# Altium PCB NB3000XN.PcbDoc (part 31 of 71)
Units mil, origin at the board's own origin, x right, y up, seen from the top; angles counter-clockwise.
Board outline 9527.56 x 6929.77 mil, 6 copper layers (Top Layer, GND+SHIELD, MidLayer1, MidLayer2, P2 - 3V3+5V0, Bottom Layer), stack 62.375 mil thick; 832 components, 1027 nets, 4655 pads, 4981 vias.
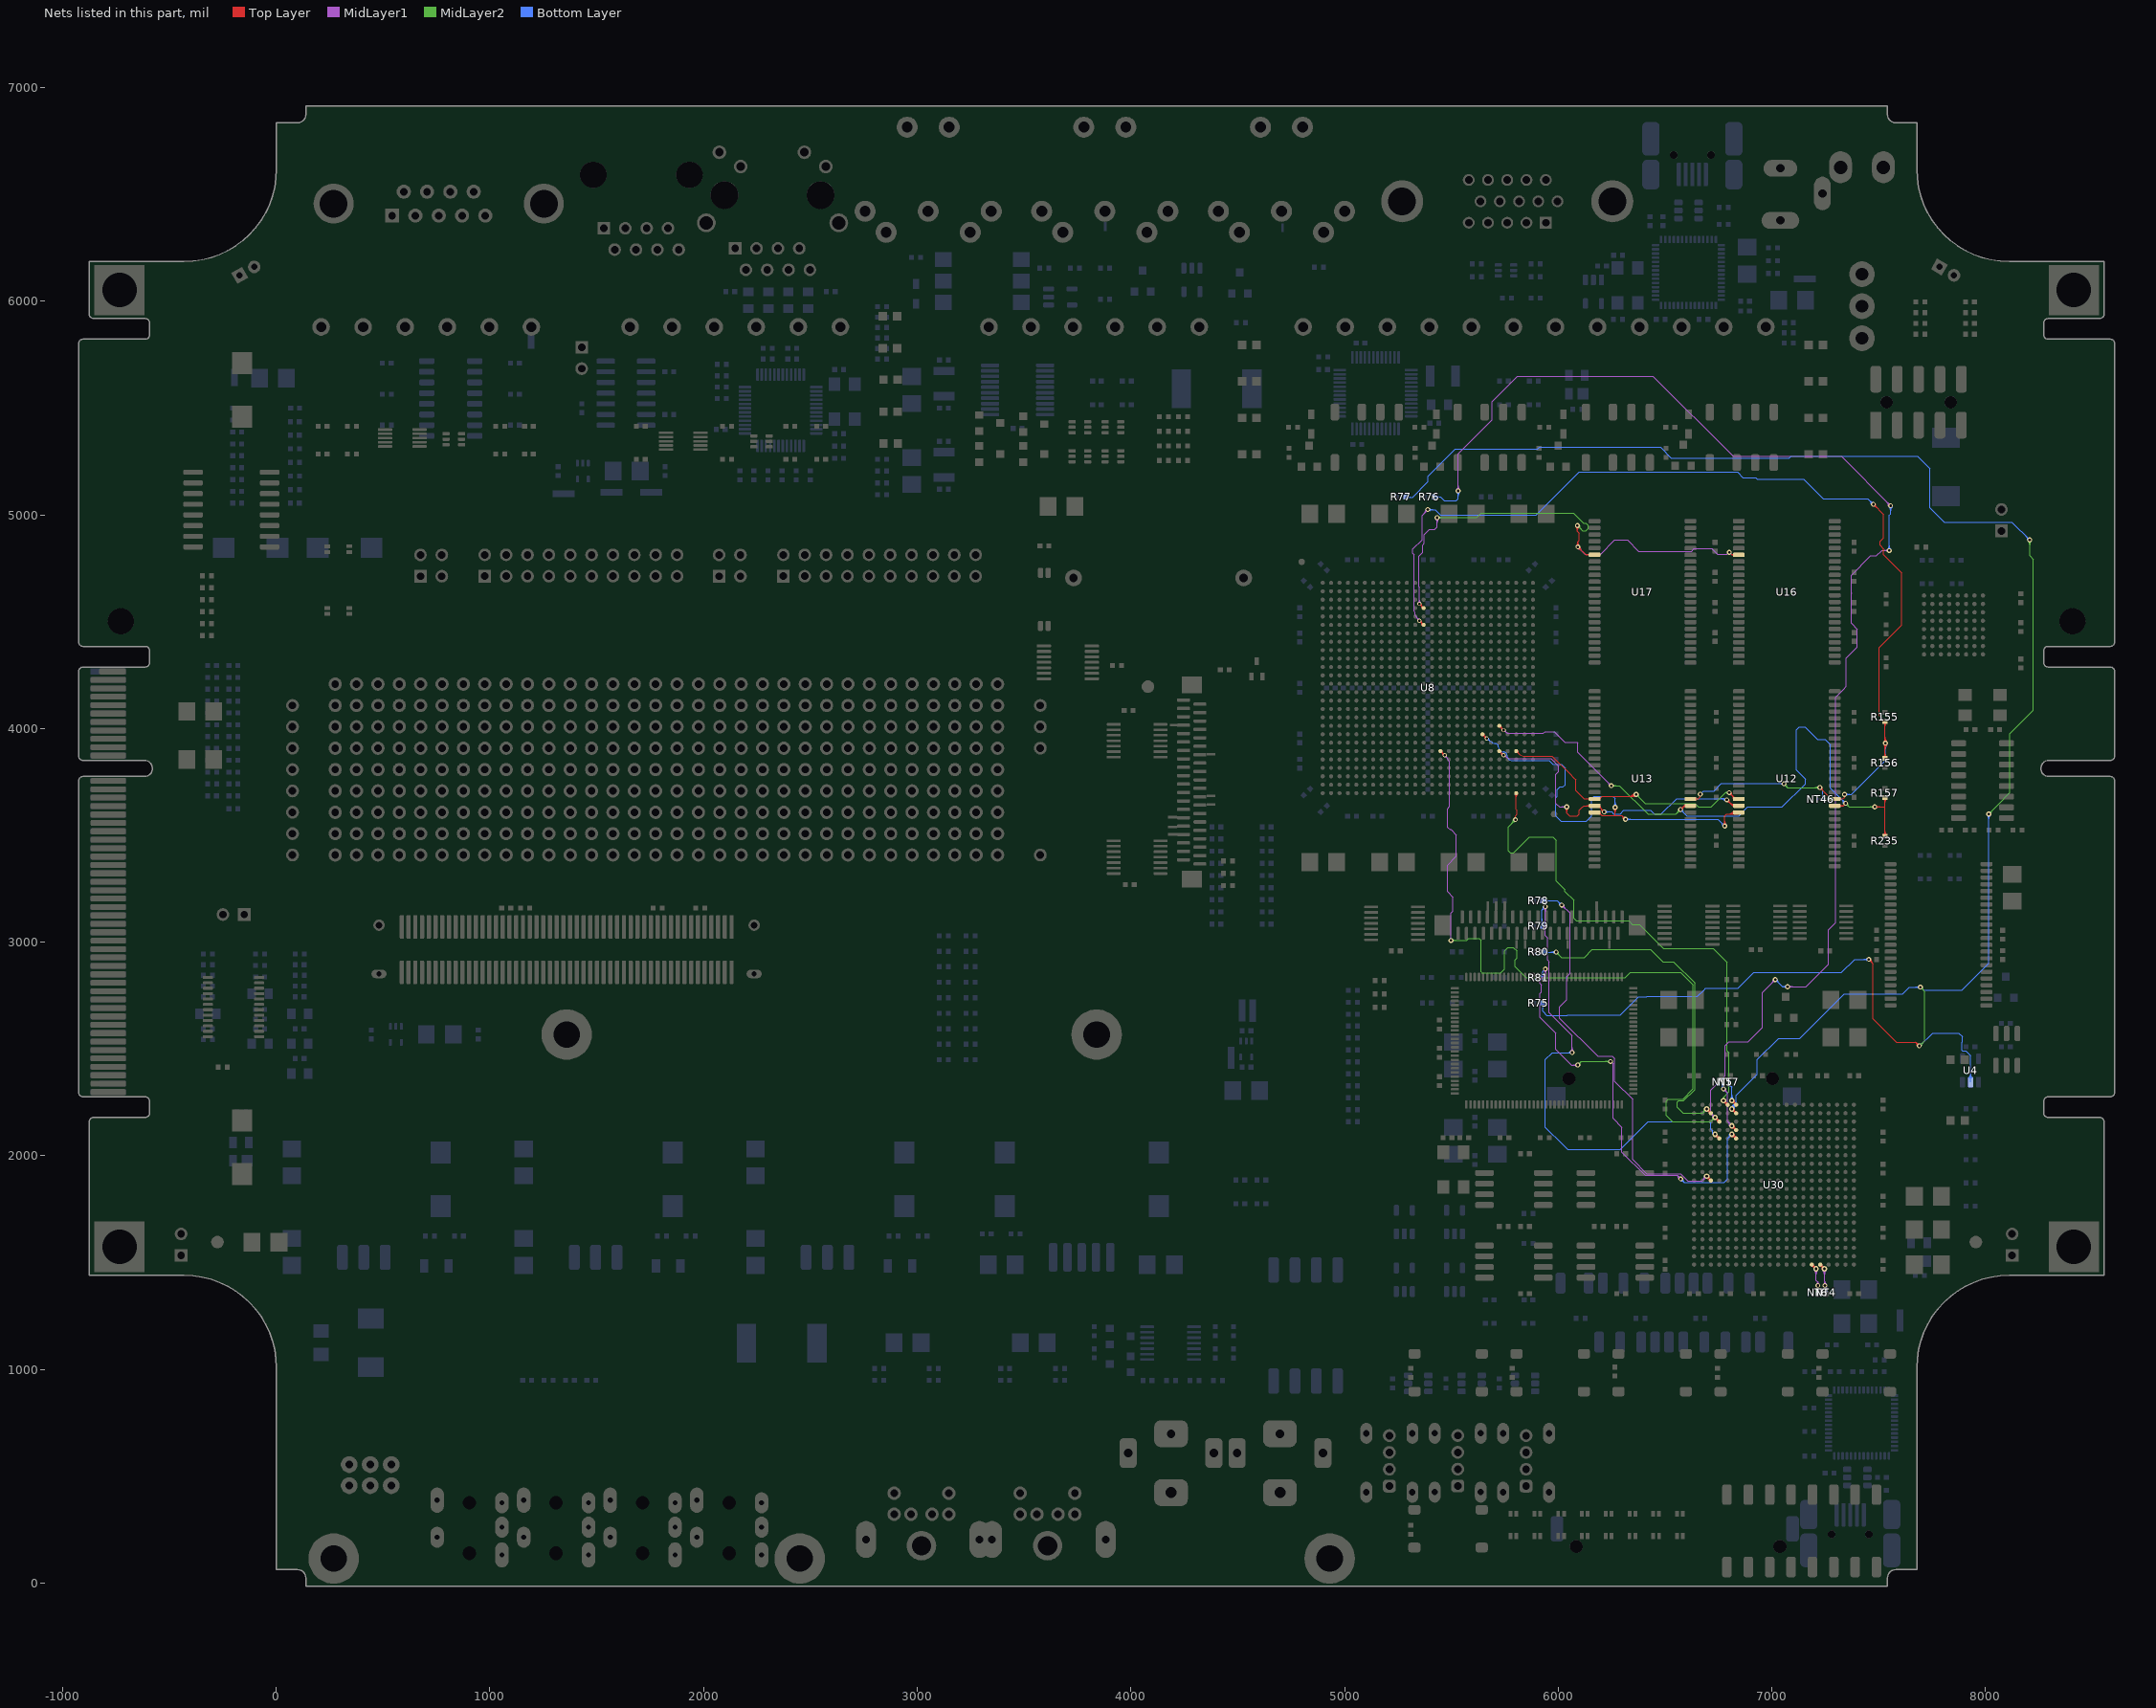
[diagram p35: the nets of this part, all layers, seen from the top]

## Via types
v1: diameter 23, hole 11.81, Top Layer to Bottom Layer, 3672 vias
v2: diameter 26, hole 11.81, Top Layer to Bottom Layer, 461 vias
v3: diameter 19, hole 11.81, Top Layer to Bottom Layer, tented both sides, 396 vias
v4: diameter 23.62, hole 11.81, Top Layer to Bottom Layer, 288 vias
v5: diameter 20, hole 11.81, Top Layer to Bottom Layer, 91 vias
v6: diameter 23, hole 11.81, Top Layer to Bottom Layer, tented both sides, 50 vias
v7: diameter 31, hole 11.81, Top Layer to Bottom Layer, 15 vias
v8: diameter 27.56, hole 11.81, Top Layer to Bottom Layer, tented both sides, 4 vias
v9: diameter 29, hole 11.81, Top Layer to Bottom Layer, 3 vias
v10: diameter 21, hole 11.81, Top Layer to Bottom Layer, 1 vias

## Nets (pads, with @x,y where several pads share a name; then routed paths per layer and width w, separated by ;. In a path a pad name is that pad's centre, name@x,y a point inside that pad or via, vN(x,y) a via of type N, cw(c..) or ccw(c..) an arc to the next point about the centre after c; other vN are vias at no path point) (continued)
DB_MEM.BUS_SDRAM_CKE: R157.2 R235.1 U8.V22 U12.37 U13.37 | length 3869.1
  Top Layer w4: U8.V22@5724.65,4005.33 cw(c5724.65,3987.23) 5737.45,4000.03 cw(c5750.25,4012.83) U8.V22@5732.15,4012.83 ; U8.V22@5724.65,4005.49 cw(c5724.65,3987.77) 5737.18,4000.3 cw(c5749.71,4012.83) U8.V22@5731.99,4012.83 ; U8.V22@5724.65,4012.83 v3(5744.33,3993.15) ; v1(6572.86,3621.04) 6590.83,3639.02 ; v1@6572.86,3626.54 ccw(c6572.86,3639.82) 6582.25,3630.43 ccw(c6591.64,3621.04) v1@6578.36,3621.04 ; v1@6572.86,3630.54 ccw(c6572.86,3653.48) 6589.07,3637.26 ccw(c6605.29,3621.04) v1@6582.36,3621.04 ; v1@6576.21,3624.4 cw(c6601.85,3598.76) U13.37@6601.85,3635.02 ; 6583.04,3631.22 cw(c6601.85,3612.41) U13.37@6601.85,3639.02 ; 6589.87,3638.05 cw(c6601.85,3626.07) U13.37@6601.85,3643.02 ; U13.37@6594.24,3636.54 ccw(c6590.83,3635.43) 6590.83,3639.02 ; U13.37@6594.24,3641.49 cw(c6590.83,3642.6) 6590.83,3639.02 ; U13.37@6619.41,3639.02 6590.83,3639.02 ; U12.37@7294.41,3639.02 7334.17,3639.02 v1(7345.19,3650.04) ; U12.37@7317.63,3633.36 cw(c7331.28,3619.7) 7331.28,3639.02 cw(c7331.28,3658.33) U12.37@7317.63,3644.67 ; v1(7481.86,3633.37) 7528.37,3633.37 7530,3635 ; v1@7485.75,3629.49 cw(c7495.14,3620.1) 7495.14,3633.37 cw(c7495.14,3646.65) v1@7485.75,3637.26 ; v1@7488.57,3626.66 cw(c7504.79,3610.44) 7504.79,3633.37 cw(c7504.79,3656.31) v1@7488.57,3640.09 ; R235.1@7523.41,3502.62 ccw(c7507.5,3518.52) 7530,3518.52 ccw(c7552.5,3518.52) R235.1@7536.59,3502.62 ; R157.2@7523.41,3671.01 cw(c7507.5,3655.1) 7530,3655.1 cw(c7552.5,3655.1) R157.2@7536.59,3671.01 ; R157.2@7524.23,3670.28 cw(c7514.83,3658.38) 7530,3658.38 ; R235.1@7526.24,3499.79 ccw(c7517.16,3508.87) 7530,3508.87 ccw(c7542.84,3508.87) R235.1@7533.76,3499.79 ; R157.2@7526.24,3673.84 cw(c7517.16,3664.76) 7530,3664.76 cw(c7542.84,3664.76) R157.2@7533.76,3673.84 ; R235.1@7530,3496.03 7530,3635 ; R157.2@7535.77,3670.28 ccw(c7545.17,3658.38) 7530,3658.38 ; 5731.53,4005.95 cw(c5718.72,3993.15) 5736.83,3993.15 ccw(c5718.72,3993.15) 5731.53,4005.95 ; 5731.53,4005.95 ccw(c5744.33,4018.76) 5744.33,4000.65 cw(c5744.33,4018.76) 5731.53,4005.95 ; 7530,3635 R157.2@7530,3677.6 7530,3658.37
  MidLayer1 w4: v3@5744.98,3985.68 cw(c5746.56,3967.64) 5758.2,3981.51 cw(c5769.84,3995.38) v3@5751.8,3993.8 ; 5757.91,3981.76 ccw(c5767.84,3991.69) 5767.84,3977.64 5861.38,3977.64 5910,3977.64 5920,3977.64 5931.48,3977.64 5938.99,3985.15 5982.91,3985.15 6031.69,3936.37 6088.52,3936.37 6091.19,3933.71 6091.19,3889.71 6114.19,3866.71 v1(6248.52,3732.37) ; v1@6239.02,3732.37 ccw(c6216.09,3732.37) 6232.31,3748.59 ccw(c6248.52,3764.81) v1@6248.52,3741.87 ; v1@6243.02,3732.37 ccw(c6229.75,3732.37) 6239.14,3741.76 ccw(c6248.52,3751.15) v1@6248.52,3737.87
  MidLayer2 w4: v1(6248.52,3732.37) 6287.63,3732.37 6419.96,3600.04 6551.86,3600.04 v1(6572.86,3621.04) ; v1@6252.41,3728.49 cw(c6261.8,3719.1) 6261.8,3732.37 cw(c6261.8,3745.65) v1@6252.41,3736.26 ; v1@6255.24,3725.66 cw(c6271.46,3709.44) 6271.46,3732.37 cw(c6271.46,3755.31) v1@6255.24,3739.09 ; v1@6563.36,3621.04 cw(c6540.42,3621.04) 6556.64,3604.82 cw(c6572.86,3588.61) v1@6572.86,3611.54 ; v1@6567.36,3621.04 cw(c6554.08,3621.04) 6563.47,3611.65 cw(c6572.86,3602.26) v1@6572.86,3615.54 ; v1@7345.19,3640.54 cw(c7345.19,3617.61) 7361.41,3633.82 cw(c7377.63,3650.04) v1@7354.69,3650.04 ; v1@7345.19,3644.54 cw(c7345.19,3631.26) 7354.58,3640.65 cw(c7363.97,3650.04) v1@7350.69,3650.04 ; v1(7345.19,3650.04) 7361.86,3633.37 v1(7481.86,3633.37) ; v1@7475.14,3626.66 ccw(c7458.92,3610.44) 7458.92,3633.37 ccw(c7458.92,3656.31) v1@7475.14,3640.09 ; v1@7477.97,3629.49 ccw(c7468.58,3620.1) 7468.58,3633.37 ccw(c7468.58,3646.65) v1@7477.97,3637.26
  Bottom Layer w4: v1@6572.86,3611.54 cw(c6572.86,3588.61) 6589.07,3604.82 cw(c6605.29,3621.04) v1@6582.36,3621.04 ; v1@6572.86,3615.54 cw(c6572.86,3602.26) 6582.25,3611.65 cw(c6591.64,3621.04) v1@6578.36,3621.04 ; v1(6572.86,3621.04) 6602.19,3591.71 6845.54,3591.71 6887.21,3633.37 7048.52,3633.37 7156.86,3741.71 7156.86,3763.37 7115.19,3805.04 7115.19,3994.37 7129.19,4008.37 7155.86,4008.37 7214.19,3950.04 7248.52,3950.04 7273.52,3925.04 7273.52,3721.71 v1(7345.19,3650.04) ; v1@7335.69,3650.04 ccw(c7312.76,3650.04) 7328.97,3666.26 ccw(c7345.19,3682.48) v1@7345.19,3659.54 ; v1@7339.69,3650.04 ccw(c7326.41,3650.04) 7335.8,3659.43 ccw(c7345.19,3668.82) v1@7345.19,3655.54
DB_MEM.BUS_SDRAM_CLK: NT46.2 R155.2 R156.1 U8.F13 U12.38 U13.38 | length 6403.5
  Top Layer w4: v3(5350.63,4504.96) U8.F13@5370.31,4485.28 ; U8.F13@5362.81,4485.28 ccw(c5344.71,4485.28) 5357.51,4498.08 ccw(c5370.31,4510.88) U8.F13@5370.31,4492.78 ; U8.F13@5362.97,4485.28 ccw(c5345.25,4485.28) 5357.78,4497.81 ccw(c5370.31,4510.34) U8.F13@5370.31,4492.62 ; U13.38@6619.41,3670.51 6655.99,3670.51 ; U13.38@6642.69,3664.92 cw(c6655.99,3651.89) 6655.99,3670.51 ; U13.38@6642.69,3676.11 ccw(c6655.99,3689.13) 6655.99,3670.51 ; v1(6665.19,3693.04) 6665.19,3679.71 6655.99,3670.51 ; v1@7224.86,3714.54 cw(c7224.86,3691.61) 7241.07,3707.82 cw(c7257.29,3724.04) v1@7234.36,3724.04 ; v1@7224.86,3718.54 cw(c7224.86,3705.26) 7234.25,3714.65 cw(c7243.64,3724.04) v1@7230.36,3724.04 ; v1(7224.86,3724.04) 7265.19,3683.71 7265.19,3670.51 ; U12.38@7269.39,3667.63 ccw(c7265.19,3666.01) 7265.19,3670.51 ; U12.38@7269.39,3673.39 cw(c7265.19,3675.01) 7265.19,3670.51 ; U12.38@7317.63,3664.85 cw(c7331.28,3651.2) 7331.28,3670.51 cw(c7331.28,3689.83) U12.38@7317.63,3676.17 ; v1(7340.19,3691.71) 7340.19,3678.51 7332.19,3670.51 U12.38@7294.41,3670.51 7265.19,3670.51 ; v1@7474.86,5040.54 cw(c7474.86,5017.61) 7491.07,5033.82 cw(c7507.29,5050.04) v1@7484.36,5050.04 ; v1@7474.86,5044.54 cw(c7474.86,5031.26) 7484.25,5040.65 cw(c7493.64,5050.04) v1@7480.36,5050.04 ; v1(7474.86,5050.04) 7523.52,5001.37 7523.52,4892.81 7507.19,4876.48 7507.19,4857.62 7523.52,4841.29 7523.52,4812.73 7606.86,4729.39 7606.86,4483.37 7502.19,4378.71 7502.19,4061.63 R155.2@7530,4033.82 v1@7530,3933.71 ; 7513.25,4050.57 cw(c7496.5,4033.82) R155.2@7520.19,4033.82 ; 7514.44,4049.38 ccw(c7529.51,4064.45) R155.2@7529.51,4043.14 ; R155.2@7520.08,4043.74 cw(c7510.16,4033.82) R155.2@7524.19,4033.82 ; R155.2@7521.27,4042.55 ccw(c7529.51,4050.79) R155.2@7529.51,4039.14 ; R156.1@7523.41,3867.26 ccw(c7507.5,3883.17) 7530,3883.17 ccw(c7552.5,3883.17) R156.1@7536.59,3867.26 ; R155.2@7523.41,4027.23 cw(c7507.5,4011.32) 7530,4011.32 cw(c7552.5,4011.32) R155.2@7536.59,4027.23 ; v1@7525.14,3925.32 cw(c7513.41,3913.59) 7530,3913.59 ; v1@7525.14,3938.76 ccw(c7513.41,3950.49) 7530,3950.49 ; R156.1@7526.24,3864.43 ccw(c7517.16,3873.51) 7530,3873.51 ccw(c7542.84,3873.51) R156.1@7533.76,3864.43 ; R155.2@7526.24,4030.06 cw(c7517.16,4020.98) 7530,4020.98 cw(c7542.84,4020.98) R155.2@7533.76,4030.06 ; R156.1@7530,3860.67 v1@7530,3932.04 ; 7530,3904.62 cw(c7559.28,3904.62) v1@7538.57,3925.32 ; 7530,3914.28 cw(c7549.62,3914.28) v1@7535.75,3928.15 ; 7530,3949.8 ccw(c7549.62,3949.8) v1@7535.75,3935.93 ; 7530,3959.46 ccw(c7559.28,3959.46) v1@7538.57,3938.76 ; 5363.43,4492.16 cw(c5376.24,4504.96) 5358.13,4504.96 ccw(c5376.24,4504.96) 5363.43,4492.16 ; 5363.43,4492.16 ccw(c5350.63,4479.35) 5350.63,4497.46 cw(c5350.63,4479.35) 5363.43,4492.16
  MidLayer1 w4: 5326.77,4581.77 5326.77,4567.84 ; v3@5343.16,4505.61 ccw(c5325.12,4507.19) 5338.99,4518.83 ; v3@5351.28,4512.43 cw(c5352.86,4530.47) 5338.99,4518.83 ; v1@5380.36,5025.04 cw(c5357.42,5025.04) 5373.64,5008.82 cw(c5389.86,4992.61) v1@5389.86,5015.54 ; v1@5384.36,5025.04 cw(c5371.08,5025.04) 5380.47,5015.65 cw(c5389.86,5006.26) v1@5389.86,5019.54 ; v1(5389.86,5025.04) 5362.86,4998.04 5362.86,4884.04 5321.19,4842.37 5319.17,4840.35 5319.17,4821 5326.77,4813.4 5326.77,4724.74 5326.77,4720 5326.77,4710 5326.77,4661.38 5326.77,4641.96 5326.77,4567.84 ; 5326.77,4567.84 5326.77,4548.34 ccw(c5368.5,4548.34) 5338.99,4518.83
  MidLayer2 w4: v1@7056.86,3732.21 cw(c7056.86,3711.69) 7071.37,3726.2 ; v1@7056.86,3736.21 cw(c7056.86,3725.34) 7064.54,3733.03 ; v1@7056.86,3740.71 7073.52,3724.04 v1(7224.86,3724.04) ; v1@7062.35,3741.53 ccw(c7076.5,3741.08) 7066.49,3731.07 ; v1@7066.35,3741.4 ccw(c7089.16,3740.67) 7073.02,3724.54 ; v1@7218.14,3717.32 ccw(c7201.92,3701.11) 7201.92,3724.04 ccw(c7201.92,3746.98) v1@7218.14,3730.76 ; v1@7220.97,3720.15 ccw(c7211.58,3710.76) 7211.58,3724.04 ccw(c7211.58,3737.32) v1@7220.97,3727.93
  Bottom Layer w4: v1(5389.86,5025.04) 5424.04,5025.04 5449.37,4999.71 5897.58,4999.71 6097.92,5200.04 6839.84,5200.04 6865.17,5174.71 6924.47,5174.71 6932.47,5166.71 7148.52,5166.71 7240.19,5075.04 7449.86,5075.04 v1(7474.86,5050.04) ; v1@5393.75,5021.15 cw(c5403.14,5011.76) 5403.14,5025.04 cw(c5403.14,5038.32) v1@5393.75,5028.93 ; v1@5396.57,5018.32 cw(c5412.79,5002.11) 5412.79,5025.04 cw(c5412.79,5047.98) v1@5396.57,5031.76 ; v1(6665.19,3693.04) 6680.19,3708.04 6729.15,3708.04 6763.82,3742.71 7055.86,3742.71 v1(7056.86,3741.71) ; 7031.51,3742.71 cw(c7031.51,3716.36) v1@7050.14,3734.99 ; 7036.34,3742.71 ccw(c7036.34,3762.23) v1@7050.14,3748.43 ; 7041.16,3742.71 cw(c7041.16,3726.02) v1@7052.97,3737.82 ; v1(7224.86,3724.04) 7239,3709.9 NT46.2@7239,3669 ; NT46.2@7236.17,3671.83 ccw(c7229.34,3678.66) 7239,3678.66 ccw(c7248.66,3678.66) NT46.2@7241.83,3671.83 ; v1(7340.19,3691.71) 7373.52,3691.71 7531.86,3850.04 v1(7531.86,3932.04) ; v1@7344.08,3687.82 cw(c7353.47,3678.43) 7353.47,3691.71 cw(c7353.47,3704.99) v1@7344.08,3695.6 ; v1@7346.91,3684.99 cw(c7363.13,3668.77) 7363.13,3691.71 cw(c7363.13,3714.64) v1@7346.91,3698.43 ; v1@7465.36,5050.04 ccw(c7442.42,5050.04) 7458.64,5066.26 ccw(c7474.86,5082.48) v1@7474.86,5059.54 ; v1@7469.36,5050.04 ccw(c7456.08,5050.04) 7465.47,5059.43 ccw(c7474.86,5068.82) v1@7474.86,5055.54 ; v1@7525.14,3925.32 cw(c7508.92,3909.11) 7531.86,3909.11 cw(c7554.79,3909.11) v1@7538.57,3925.32 ; v1@7527.97,3928.15 cw(c7518.58,3918.76) 7531.86,3918.76 cw(c7545.14,3918.76) v1@7535.75,3928.15
DB_MEM.BUS_SDRAM_NCAS: U8.AA24 U12.17 U13.17 | length 1676.9
  Top Layer w4: U13.17@6147.37,3664.85 ccw(c6133.72,3651.2) 6133.72,3670.51 ccw(c6133.72,3689.83) U13.17@6147.37,3676.17 ; U13.17@6188.81,3674.46 ccw(c6190.83,3686.56) 6199.51,3677.88 ; U13.17@6189.47,3678.4 ccw(c6192.41,3695.97) 6205,3683.37 ; U13.17@6196.15,3670.51 cw(c6205.84,3670.51) 6198.99,3677.36 ; 6322.14,3683.37 ccw(c6322.14,3734.76) v1@6358.47,3698.43 ; 6331.79,3683.37 ccw(c6331.79,3725.1) v1@6361.3,3695.6 ; 6341.45,3683.37 ccw(c6341.45,3715.45) v1@6364.13,3692.77 ; 6351.11,3683.37 ccw(c6351.11,3705.79) v1@6366.96,3689.94 ; v1(6365.19,3691.71) 6365.19,3685.04 6363.52,3683.37 6205,3683.37 ; v1@6800.52,3690.54 cw(c6800.52,3667.61) 6816.74,3683.82 cw(c6832.96,3700.04) v1@6810.02,3700.04 ; v1@6800.52,3694.54 cw(c6800.52,3681.26) 6809.91,3690.65 cw(c6819.3,3700.04) v1@6806.02,3700.04 ; v1(6800.52,3700.04) 6830.05,3670.51 U12.17@6845.59,3670.51 ; 6812.95,3687.62 cw(c6795.84,3670.51) U12.17@6820.03,3670.51 ; 6817.83,3682.74 ccw(c6828.03,3692.94) U12.17@6828.03,3678.51 ; 6819.77,3680.79 cw(c6809.49,3670.51) U12.17@6824.03,3670.51 ; 5815.92,3882.19 ccw(c5843.27,3909.54) 5843.27,3870.86 ; 5815.92,3882.19 ccw(c5843.27,3909.54) 5843.27,3870.86 ; 5815.92,3882.19 ccw(c5803.39,3869.66) 5803.39,3887.38 cw(c5803.39,3869.66) 5815.92,3882.19 ; 5815.92,3882.19 cw(c5828.45,3894.72) 5810.73,3894.72 ccw(c5828.45,3894.72) 5815.92,3882.19 ; 5843.27,3870.86 5910,3870.86 5920,3870.86 5971.06,3870.86 6052.7,3789.22 6074.88,3767.04 ; 6074.88,3767.04 6081.86,3760.06 ; 6074.88,3767.04 6081.86,3760.06 ; 6081.86,3760.06 6081.86,3710.04 6108.52,3683.37 6121.39,3670.51 U13.17@6170.59,3670.51 6192.14,3670.51 6205,3683.37
  MidLayer2 w4: v1@6365.19,3682.21 cw(c6365.19,3659.27) 6381.41,3675.49 cw(c6397.63,3691.71) v1@6374.69,3691.71 ; v1@6365.19,3686.21 cw(c6365.19,3672.93) 6374.58,3682.32 cw(c6383.97,3691.71) v1@6370.69,3691.71 ; v1(6365.19,3691.71) 6406.86,3650.04 6640.19,3650.04 6656.86,3633.37 6716.86,3633.37 6783.52,3700.04 ; v1@6792.43,3695.06 ccw(c6783.52,3689.58) 6783.52,3700.04 ; v1@6792.43,3705.02 cw(c6783.52,3710.5) 6783.52,3700.04 ; v1(6800.52,3700.04) 6783.52,3700.04
DB_MEM.BUS_SDRAM_NCS: U8.W20 U12.19 U13.19 | length 2619.8
  Top Layer w4: U8.W20@5645.91,3965.96 cw(c5645.91,3947.86) 5658.71,3960.66 cw(c5671.51,3973.46) U8.W20@5653.41,3973.46 ; U8.W20@5645.91,3966.12 cw(c5645.91,3948.4) 5658.44,3960.93 cw(c5670.97,3973.46) U8.W20@5653.25,3973.46 ; U8.W20@5645.91,3973.46 v3(5665.59,3953.78) ; U13.19@6170.59,3607.52 6189.86,3607.52 6205,3592.37 6265.19,3592.37 ; U13.19@6188.15,3599.52 cw(c6188.15,3576.09) 6204.72,3592.66 ; U13.19@6188.15,3603.52 cw(c6188.15,3589.75) 6197.89,3599.49 ; U13.19@6196.15,3607.52 ccw(c6211.35,3607.52) 6200.6,3596.77 ; v1@6259.81,3624.66 cw(c6243.59,3608.44) 6266.52,3608.44 cw(c6289.46,3608.44) v1@6273.24,3624.66 ; v1@6262.64,3627.49 cw(c6253.25,3618.1) 6266.52,3618.1 cw(c6279.8,3618.1) v1@6270.41,3627.49 ; v1@6265.19,3631.37 v1(6266.52,3631.37) 6266.52,3593.71 6265.19,3592.37 ; v1@6305.69,3575.04 ccw(c6282.76,3575.04) 6298.97,3591.26 ccw(c6315.19,3607.48) v1@6315.19,3584.54 ; v1@6309.69,3575.04 ccw(c6296.41,3575.04) 6305.8,3584.43 ccw(c6315.19,3593.82) v1@6315.19,3580.54 ; v1(6315.19,3575.04) 6297.86,3592.37 6265.19,3592.37 ; v1@6772.81,3550.76 ccw(c6756.59,3566.98) 6779.52,3566.98 ccw(c6802.46,3566.98) v1@6786.24,3550.76 ; v1@6775.64,3547.93 ccw(c6766.25,3557.32) 6779.52,3557.32 ccw(c6792.8,3557.32) v1@6783.41,3547.93 ; v1(6779.52,3544.04) 6779.52,3591.71 6787.86,3600.04 6838.11,3600.04 U12.19@6845.59,3607.52 ; 6790.66,3600.04 ccw(c6790.66,3644.89) U12.19@6822.37,3613.18 ; 6800.32,3600.04 ccw(c6800.32,3635.23) U12.19@6825.2,3610.35 ; 6809.98,3600.04 ccw(c6809.98,3625.58) U12.19@6828.03,3607.52 ; U12.19@6819.63,3600.04 ccw(c6819.63,3615.92) U12.19@6830.86,3604.69 ; 5652.79,3966.58 cw(c5639.98,3953.78) 5658.09,3953.78 ccw(c5639.98,3953.78) 5652.79,3966.58 ; 5652.79,3966.58 ccw(c5665.59,3979.39) 5665.59,3961.28 cw(c5665.59,3979.39) 5652.79,3966.58
  Bottom Layer w4: v3@5666.89,3946.39 cw(c5670.04,3928.56) 5680.42,3943.39 ; v3@5672.98,3955.08 ccw(c5690.81,3958.23) 5680.42,3943.39 ; 6266.52,3655 v1(6266.52,3631.37) 6266.52,3673.48 6256.29,3683.71 6168.5,3683.71 6156.86,3672.06 6156.86,3591.71 6131.86,3566.71 6014.19,3566.71 5989.19,3591.71 5989.19,3675 5996,3681.81 5996,3714 6009.19,3727.19 6022.38,3727.19 6032.81,3737.62 6032.81,3815.75 6015.19,3833.37 5975,3833.37 5957.11,3851.27 5920,3851.27 5910,3851.27 5841.96,3851.27 5783.7,3851.27 cw(c5783.7,3875.04) 5759.93,3875.04 ccw(c5744.33,3875.04) 5744.33,3890.64 cw(c5744.33,3914.41) 5720.56,3914.41 ccw(c5704.96,3914.41) 5704.96,3930.01 cw(c5704.96,3953.78) 5688.15,3936.97 5680.42,3943.39 ; v1(6315.19,3575.04) 6748.52,3575.04 v1(6779.52,3544.04) ; v1@6319.08,3571.15 cw(c6328.47,3561.76) 6328.47,3575.04 cw(c6328.47,3588.32) v1@6319.08,3578.93 ; v1@6321.91,3568.32 cw(c6338.13,3552.11) 6338.13,3575.04 cw(c6338.13,3597.98) v1@6321.91,3581.76 ; v1@6770.02,3544.04 ccw(c6747.09,3544.04) 6763.31,3560.26 ccw(c6779.52,3576.48) v1@6779.52,3553.54 ; v1@6774.02,3544.04 ccw(c6760.75,3544.04) 6770.14,3553.43 ccw(c6779.52,3562.82) v1@6779.52,3549.54 ; 6266.52,3644.65 cw(c6253.25,3644.65) 6262.64,3635.26 ccw(c6253.25,3644.65) 6266.52,3644.65 ; 6266.52,3644.65 ccw(c6279.8,3644.65) 6270.41,3635.26 cw(c6279.8,3644.65) 6266.52,3644.65 ; 6266.52,3654.31 cw(c6243.59,3654.31) 6259.81,3638.09 ccw(c6243.59,3654.31) 6266.52,3654.31 ; 6266.52,3654.31 ccw(c6289.46,3654.31) 6273.24,3638.09 cw(c6289.46,3654.31) 6266.52,3654.31
DB_MEM.BUS_SDRAM_NRAS: U8.AA22 U12.18 U13.18 | length 2151.1
  Top Layer w4: U8.AA22@5724.65,3887.22 cw(c5724.65,3869.12) 5737.45,3881.92 cw(c5750.25,3894.72) U8.AA22@5732.15,3894.72 ; U8.AA22@5724.65,3887.38 cw(c5724.65,3869.66) 5737.18,3882.19 cw(c5749.71,3894.72) U8.AA22@5731.99,3894.72 ; U8.AA22@5724.65,3894.72 v3(5744.33,3875.04) ; v1@6033.47,3626.66 cw(c6017.26,3610.44) 6040.19,3610.44 cw(c6063.13,3610.44) v1@6046.91,3626.66 ; v1@6036.3,3629.49 cw(c6026.91,3620.1) 6040.19,3620.1 cw(c6053.47,3620.1) v1@6044.08,3629.49 ; v1(6040.19,3633.37) 6040.19,3604.81 6053.29,3591.71 6090.19,3591.71 6098.52,3600.04 6098.52,3616.71 6112.76,3630.95 6120.83,3639.02 U13.18@6170.59,3639.02 6186.22,3639.02 6193.6,3631.63 v1(6215.19,3610.04) ; U13.18@6147.37,3633.36 ccw(c6133.72,3619.7) 6133.72,3639.02 ccw(c6133.72,3658.33) U13.18@6147.37,3644.67 ; U13.18@6188.15,3631.02 cw(c6188.15,3616.37) 6198.51,3626.73 ; U13.18@6192.15,3639.02 ccw(c6206.47,3639.02) 6196.34,3628.89 ; U13.18@6196.15,3639.02 ccw(c6220.13,3639.01) 6203.17,3622.06 ; v1@6205.69,3610.04 ccw(c6182.76,3610.04) 6198.97,3626.26 ccw(c6215.19,3642.48) v1@6215.19,3619.54 ; v1@6209.69,3610.04 ccw(c6196.41,3610.04) 6205.8,3619.43 ccw(c6215.19,3628.82) v1@6215.19,3615.54 ; v1@6789.19,3657.21 cw(c6789.19,3634.27) 6805.41,3650.49 cw(c6821.63,3666.71) v1@6798.69,3666.71 ; v1@6789.19,3661.21 cw(c6789.19,3647.93) 6798.58,3657.32 cw(c6807.97,3666.71) v1@6794.69,3666.71 ; v1(6789.19,3666.71) 6816.88,3639.02 ; v1@6795.34,3660.55 ccw(c6828.03,3693.24) U12.18@6828.03,3647.02 ; 6802.17,3653.73 ccw(c6828.03,3679.59) U12.18@6828.03,3643.02 ; 6809,3646.9 ccw(c6828.03,3665.93) U12.18@6828.03,3639.02 ; 6815.83,3640.07 ccw(c6828.03,3652.27) U12.18@6828.03,3635.02 ; U12.18@6820.45,3636.45 ccw(c6816.88,3635.25) 6816.88,3639.02 ; U12.18@6820.45,3641.58 cw(c6816.88,3642.78) 6816.88,3639.02 ; U12.18@6845.59,3639.02 6816.88,3639.02 ; 5731.53,3887.84 cw(c5718.72,3875.04) 5736.83,3875.04 ccw(c5718.72,3875.04) 5731.53,3887.84 ; 5731.53,3887.84 ccw(c5744.33,3900.65) 5744.33,3882.54 cw(c5744.33,3900.65) 5731.53,3887.84
  MidLayer1 w4: v3@5745.63,3867.65 cw(c5748.78,3849.82) 5759.16,3864.65 cw(c5769.55,3879.49) v3@5751.72,3876.34 ; 5759.19,3864.62 ccw(c5776.84,3892.66) 5777.01,3859.53 5861.38,3859.53 5910,3859.53 5920,3859.53 5966.53,3859.53 6003,3823.06 6003,3798.81 5989.19,3785 5989.19,3650.04 6005.86,3633.37 v1(6040.19,3633.37) ; v1@6033.47,3626.66 ccw(c6017.26,3610.44) 6017.26,3633.37 ccw(c6017.26,3656.31) v1@6033.47,3640.09 ; v1@6036.3,3629.49 ccw(c6026.91,3620.1) 6026.91,3633.37 ccw(c6026.91,3646.65) v1@6036.3,3637.26
  Bottom Layer w4: v1(6215.19,3610.04) 6250.21,3610.04 6260.21,3600.04 6290.19,3600.04 6307.19,3617.04 6432.96,3617.04 6449.96,3600.04 ; v1@6219.08,3606.15 cw(c6228.47,3596.76) 6228.47,3610.04 cw(c6228.47,3623.32) v1@6219.08,3613.93 ; v1@6221.91,3603.32 cw(c6238.13,3587.11) 6238.13,3610.04 cw(c6238.13,3632.98) v1@6221.91,3616.76 ; 6450,3600 6449.96,3600.04 ; 6752.57,3672.37 cw(c6752.57,3630.09) v1@6782.47,3659.99 ; 6762.23,3672.37 cw(c6762.23,3639.75) v1@6785.3,3662.82 ; 6771.89,3672.37 cw(c6771.89,3649.41) v1@6788.13,3665.65 ; v1(6789.19,3666.71) 6783.52,3672.37 6554.19,3672.37 6481.86,3600.04 6449.96,3600.04
DB_MEM.BUS_SRAM_NCS: U8.D13 U16.6 U17.6 | length 2993.7
  Top Layer w4: v3(5350.63,4583.7) U8.D13@5370.31,4564.02 ; U8.D13@5362.81,4564.02 ccw(c5344.71,4564.02) 5357.51,4576.82 ccw(c5370.31,4589.62) U8.D13@5370.31,4571.52 ; U8.D13@5362.97,4564.02 ccw(c5345.25,4564.02) 5357.78,4576.55 ccw(c5370.31,4589.08) U8.D13@5370.31,4571.36 ; v1@6083.47,4943.32 cw(c6067.26,4927.11) 6090.19,4927.11 cw(c6113.13,4927.11) v1@6096.91,4943.32 ; v1@6085.47,4856.76 ccw(c6069.26,4872.98) 6092.19,4872.98 ccw(c6115.13,4872.98) v1@6098.91,4856.76 ; v1@6086.3,4946.15 cw(c6076.91,4936.76) 6090.19,4936.76 cw(c6103.47,4936.76) v1@6094.08,4946.15 ; v1@6088.3,4853.93 ccw(c6078.91,4863.32) 6092.19,4863.32 ccw(c6105.47,4863.32) v1@6096.08,4853.93 ; v1(6090.19,4950.04) 6090.19,4923.33 6098.52,4915 6098.52,4880 6092.19,4873.67 v1(6092.19,4850.04) 6129,4813.23 U17.6@6170.59,4813.23 ; v1@6092.19,4840.54 cw(c6092.19,4817.61) 6108.41,4833.82 cw(c6124.63,4850.04) v1@6101.69,4850.04 ; v1@6092.19,4844.54 cw(c6092.19,4831.26) 6101.58,4840.65 cw(c6110.97,4850.04) v1@6097.69,4850.04 ; U17.6@6147.37,4807.57 ccw(c6133.72,4793.91) 6133.72,4813.23 ccw(c6133.72,4832.54) U17.6@6147.37,4818.88 ; v1(6800.86,4825.04) 6812.67,4813.23 ; U16.6@6821.48,4808.64 ccw(c6812.67,4802.48) 6812.67,4813.23 ; U16.6@6821.48,4817.81 cw(c6812.67,4823.97) 6812.67,4813.23 ; U16.6@6845.59,4813.23 6812.67,4813.23 ; 5363.43,4570.9 cw(c5376.24,4583.7) 5358.13,4583.7 ccw(c5376.24,4583.7) 5363.43,4570.9 ; 5363.43,4570.9 ccw(c5350.63,4558.09) 5350.63,4576.2 cw(c5350.63,4558.09) 5363.43,4570.9
  MidLayer1 w4: v3@5345.44,4588.89 ccw(c5332.9,4601.43) 5350.63,4601.43 ccw(c5368.36,4601.43) v3@5355.82,4588.89 ; v3(5350.63,4583.7) 5350.63,4661.38 5347.5,4664.51 5347.5,4710 5347.5,4720 5347.5,4807.35 5365.19,4825.04 5365.19,4858.37 5373.52,4866.71 5373.52,4908.37 5397.69,4932.54 5422.11,4932.54 5432.69,4943.12 5432.69,4950.87 5433.19,4951.37 5433.52,4951.71 v1(5433.52,4987.37) ; v1@5426.81,4980.66 cw(c5410.59,4964.44) 5433.52,4964.44 cw(c5456.46,4964.44) v1@5440.24,4980.66 ; v1@5429.64,4983.49 cw(c5420.25,4974.1) 5433.52,4974.1 cw(c5446.8,4974.1) v1@5437.41,4983.49 ; v1@6092.19,4840.54 cw(c6092.19,4817.61) 6108.41,4833.82 cw(c6124.63,4850.04) v1@6101.69,4850.04 ; v1@6092.19,4844.54 cw(c6092.19,4831.26) 6101.58,4840.65 cw(c6110.97,4850.04) v1@6097.69,4850.04 ; v1(6092.19,4850.04) 6125.52,4816.71 6198.52,4816.71 6265.19,4883.37 6323.52,4883.37 6376.52,4830.37 6510,4830.37 6623.67,4830.37 6635,4841.71 6719.19,4841.71 6745.52,4815.37 6791.19,4815.37 v1(6800.86,4825.04) ; 5350.63,4601.81 cw(c5332.52,4601.81) 5345.33,4589 ccw(c5332.52,4601.81) 5350.63,4601.81 ; 5350.63,4601.81 ccw(c5368.74,4601.81) 5355.93,4589 cw(c5368.74,4601.81) 5350.63,4601.81
  MidLayer2 w4: v1(5433.52,4987.37) 5618.58,4987.37 5639.41,5008.2 6071.84,5008.2 6119.5,4960.54 6130.77,4960.54 6141.02,4950.29 6141.02,4935.79 6130.77,4925.54 6114.69,4925.54 v1@6088,4952.23 ; v1@5437.41,4983.49 cw(c5446.8,4974.1) 5446.8,4987.37 cw(c5446.8,5000.65) v1@5437.41,4991.26 ; v1@5440.24,4980.66 cw(c5456.46,4964.44) 5456.46,4987.37 cw(c5456.46,5010.31) v1@5440.24,4994.09 ; v1@6090.19,4940.54 cw(c6090.19,4917.61) 6106.41,4933.82 cw(c6122.62,4950.04) v1@6099.69,4950.04 ; v1@6090.19,4944.54 cw(c6090.19,4931.26) 6099.58,4940.65 cw(c6108.97,4950.04) v1@6095.69,4950.04
DB_PROGRAM.CCLK: R78.1 U30.V10 | length 2223.1
  Top Layer w8: v2@6695.04,1895.37 cw(c6695.04,1873.64) 6710.4,1889.01 cw(c6725.77,1904.37) v2@6704.04,1904.37 ; v2(6695.04,1904.37) U30.V10@6714.72,1884.68 ; U30.V10@6708.88,1884.68 ccw(c6694.78,1884.68) 6704.75,1894.66 ccw(c6714.72,1904.63) U30.V10@6714.72,1890.53
  MidLayer1 w4: v1@6016.52,3164.21 cw(c6016.52,3141.27) 6032.74,3157.49 cw(c6048.96,3173.71) v1@6026.02,3173.71 ; v1@6016.52,3168.21 cw(c6016.52,3154.93) 6025.91,3164.32 cw(c6035.3,3173.71) v1@6022.02,3173.71 ; v1(6016.52,3173.71) 6054.86,3135.37 6054.86,2853.35 6040.19,2838.69 6040.19,2730.39 6006.86,2697.06 6006.86,2644.69 6184.84,2466.71 6253.19,2466.71 6265.19,2454.71 6265.19,2348.04 6348.52,2264.71 6348.52,1983.37 6415.19,1916.71 6573.52,1916.71 6606.86,1883.37 6674.05,1883.37 v2(6695.04,1904.37) ; v2@6684.04,1904.37 cw(c6657.48,1904.37) 6676.26,1885.59 cw(c6695.04,1866.82) v2@6695.04,1893.37 ; v2@6688.04,1904.37 cw(c6671.14,1904.37) 6683.09,1892.42 cw(c6695.04,1880.47) v2@6695.04,1897.37
  Bottom Layer w4: R78.1@5928.18,3195 5995.23,3195 v1(6016.52,3173.71) ; R78.1@5931.94,3191.24 cw(c5941.02,3182.16) 5941.02,3195 cw(c5941.02,3207.84) R78.1@5931.94,3198.76 ; R78.1@5934.77,3188.41 cw(c5950.68,3172.5) 5950.68,3195 cw(c5950.68,3217.5) R78.1@5934.77,3201.59 ; v1@6007.02,3173.71 ccw(c5984.09,3173.71) 6000.31,3189.93 ccw(c6016.52,3206.14) v1@6016.52,3183.21 ; v1@6011.02,3173.71 ccw(c5997.75,3173.71) 6007.14,3183.1 ccw(c6016.52,3192.49) v1@6016.52,3179.21
DB_PROGRAM.DIN: U8.AF24 U30.T1 | length 2629.5
  Top Layer w4: U8.AF24@5798.08,3692.57 cw(c5785.28,3679.77) 5803.39,3679.77 cw(c5821.49,3679.77) U8.AF24@5808.69,3692.57 ; U8.AF24@5798.19,3692.68 cw(c5785.66,3680.15) 5803.39,3680.15 cw(c5821.11,3680.15) U8.AF24@5808.58,3692.68 ; v1(5799.86,3573.37) 5799.86,3591.17 5807.69,3599 5807.69,3618.96 5803.39,3623.26 5803.39,3660 5803.39,3670 U8.AF24@5803.39,3697.87
  Top Layer w8: v2@6773.78,2249.7 cw(c6773.78,2227.97) 6789.14,2243.34 cw(c6804.51,2258.7) v2@6782.78,2258.7 ; v2(6773.78,2258.7) U30.T1@6793.46,2239.02 ; U30.T1@6787.62,2239.02 ccw(c6773.52,2239.02) 6783.49,2248.99 ccw(c6793.46,2258.96) U30.T1@6793.46,2244.86
  MidLayer2 w4: v1@5790.36,3573.37 cw(c5767.42,3573.37) 5783.64,3557.16 cw(c5799.86,3540.94) v1@5799.86,3563.87 ; v1@5794.36,3573.37 cw(c5781.08,3573.37) 5790.47,3563.99 cw(c5799.86,3554.6) v1@5799.86,3567.87 ; v1(5799.86,3573.37) 5766.86,3540.37 5766.86,3428.14 5776.63,3418.37 5791.86,3418.37 5865.19,3491.71 5975.19,3491.71 5990.86,3476.04 5990.86,3286.04 6031.86,3245.04 6031.86,3238.14 6073.52,3196.48 6073.52,3111.35 6085.17,3099.71 6331.48,3099.71 6347.82,3083.37 6380.09,3083.37 6492.43,2971.04 6726.52,2971.04 6790.86,2906.71 6790.86,2491.04 6798.52,2483.37 6798.52,2300.04 6773.78,2275.3 ; v2@6769.5,2268.83 ccw(c6766.76,2275.3) 6773.78,2275.3 ; v2(6773.78,2258.7) 6773.78,2275.3 ; v2@6778.06,2268.83 cw(c6780.8,2275.3) 6773.78,2275.3
DB_PROGRAM.DONE: R75.1 R77.1 U4.2 U30.R2 | length 10924.7
  Top Layer w4: v1@7453.86,2910.21 cw(c7453.86,2887.27) 7470.07,2903.49 cw(c7486.29,2919.71) v1@7463.36,2919.71 ; v1@7453.86,2914.21 cw(c7453.86,2900.93) 7463.25,2910.32 cw(c7472.64,2919.71) v1@7459.36,2919.71 ; v1(7453.86,2919.71) 7473.52,2900.04 7473.52,2641.71 7550.09,2565.14 7583.67,2531.57 7673.43,2531.57 v1(7690,2515) ; v1@7680.5,2515 ccw(c7657.56,2515) 7673.78,2531.22 ccw(c7690,2547.43) v1@7690,2524.5 ; v1@7684.5,2515 ccw(c7671.22,2515) 7680.61,2524.39 ccw(c7690,2533.78) v1@7690,2520.5
  Top Layer w8: v2@6813.15,2210.33 cw(c6813.15,2188.6) 6828.51,2203.97 cw(c6843.88,2219.33) v2@6822.15,2219.33 ; v2(6813.15,2219.33) U30.R2@6832.83,2199.65 ; U30.R2@6826.99,2199.65 ccw(c6812.89,2199.65) 6822.86,2209.62 ccw(c6832.83,2219.59) U30.R2@6832.83,2205.49
  MidLayer2 w4: v1@7690,2520.5 ccw(c7690,2540.58) 7704.2,2526.38 ; v1@7690,2524.5 ccw(c7690,2554.23) 7711.03,2533.21 ; v1@7692.82,2515 7715.52,2537.71 7715.52,2769.48 v1(7695,2790) ; v1@7695,2780.5 cw(c7695,2757.56) 7711.22,2773.78 cw(c7727.44,2790) v1@7704.5,2790 ; v1@7695,2784.5 cw(c7695,2771.22) 7704.39,2780.61 cw(c7713.78,2790) v1@7700.5,2790 ; v1@7699.5,2515 cw(c7715.64,2515) 7704.23,2526.41 ; v1(8015.19,3600.04) 8060.07,3644.93 ; v1@8015.19,3605.54 ccw(c8015.19,3618.82) 8024.58,3609.43 ccw(c8033.97,3600.04) v1@8020.69,3600.04 ; v1@8015.19,3609.54 ccw(c8015.19,3632.48) 8031.41,3616.26 ccw(c8047.63,3600.04) v1@8024.69,3600.04 ; 8060,3645 8114.86,3699.86 8114.86,3977.06 8223.52,4085.73 8223.52,4791.71 8206.86,4808.37 v1(8206.86,4883.37) ; v1@8200.14,4876.66 cw(c8183.92,4860.44) 8206.86,4860.44 cw(c8229.79,4860.44) v1@8213.57,4876.66 ; v1@8202.97,4879.49 cw(c8193.58,4870.1) 8206.86,4870.1 cw(c8220.14,4870.1) v1@8210.75,4879.49
  Bottom Layer w4: R77.1@5286.18,5085 5286.18,5083.37 5318.52,5083.37 5391.52,5156.37 5391.52,5181.52 5517.5,5307.5 5903.31,5307.5 5913.19,5317.37 6478,5317.37 6528.67,5266.71 7081.67,5266.71 7090,5275.04 7682.33,5275.04 7740.19,5217.18 7740.19,5033.37 7806.86,4966.71 8123.52,4966.71 v1(8206.86,4883.37) ; R77.1@5289.94,5088.27 ccw(c5301.76,5100.08) 5301.76,5083.37 ; R77.1@5292.77,5077.92 cw(c5305.94,5064.75) 5305.94,5083.37 ; R77.1@5292.77,5091.1 ccw(c5311.41,5109.74) 5311.41,5083.37 ; R75.1@5921.59,2707.92 cw(c5905.68,2692.01) 5928.18,2692.01 cw(c5950.68,2692.01) R75.1@5934.77,2707.92 ; R75.1@5924.42,2710.75 cw(c5915.34,2701.67) 5928.18,2701.67 cw(c5941.02,2701.67) R75.1@5931.94,2710.75 ; R75.1@5928.18,2715 5928.18,2676.82 5946.96,2658.04 6041.96,2658.04 ; 6041.96,2658.37 6290.19,2658.37 6375.86,2744.04 6413.86,2744.04 6416.86,2747.04 6652.52,2747.04 6681.86,2776.37 6689.19,2783.71 6841.13,2783.71 6915.8,2858.37 7325.9,2858.37 7387.23,2919.71 v1(7453.86,2919.71) ; v2@6812.17,2219.13 cw(c6829.59,2222.64) 6817.03,2235.21 ; v2@6815.19,2219.33 6815.19,2233.37 6832.86,2251.04 ; v2@6816.09,2219.92 cw(c6838.38,2224.41) 6822.3,2240.49 ; v2@6820.01,2220.71 cw(c6847.16,2226.18) 6827.58,2245.76 ; v2@6823.93,2221.5 cw(c6855.95,2227.95) 6832.86,2251.04 ; v1@7447.14,2912.99 ccw(c7430.92,2896.77) 7430.92,2919.71 ccw(c7430.92,2942.64) v1@7447.14,2926.43 ; v1@7449.97,2915.82 ccw(c7440.58,2906.43) 7440.58,2919.71 ccw(c7440.58,2932.99) v1@7449.97,2923.6 ; v1@7688.28,2783.28 ccw(c7672.06,2767.06) 7672.06,2790 ccw(c7672.06,2812.93) v1@7688.28,2796.72 ; v1@7690,2520.5 ccw(c7690,2540.58) 7704.2,2526.38 ; v1@7690,2524.5 ccw(c7690,2554.23) 7711.03,2533.21 ; v1@7691.11,2786.11 ccw(c7681.72,2776.72) 7681.72,2790 ccw(c7681.72,2803.28) v1@7691.11,2793.89 ; v1@7692.82,2515 7752.86,2575.04 7874.52,2575.04 7891.52,2558.04 7891.52,2533.37 7890.19,2532.04 7890.19,2494.37 7892.86,2491.71 7906.86,2491.71 7930,2468.56 U4.2@7930,2344.88 ; v1@7699.5,2515 cw(c7715.64,2515) 7704.23,2526.41 ; U4.2@7923.06,2365.6 ccw(c7906.31,2382.35) 7930,2382.35 ccw(c7953.68,2382.35) U4.2@7936.94,2365.6 ; U4.2@7925.89,2362.77 ccw(c7915.97,2372.69) 7930,2372.69 ccw(c7944.03,2372.69) U4.2@7934.11,2362.77 ; v1@8008.47,3593.32 cw(c7992.26,3577.11) 8015.19,3577.11 cw(c8038.13,3577.11) v1@8021.91,3593.32 ; v1@8011.3,3596.15 cw(c8001.91,3586.76) 8015.19,3586.76 cw(c8028.47,3586.76) v1@8019.08,3596.15 ; v1(8015.19,3600.04) 8015.19,2900.65 7889.58,2775.04 7709.96,2775.04 v1(7695,2790) 7643.84,2790 7611.88,2758.04 7339.86,2758.04 7131.86,2550.04 7031.86,2550.04 6931.86,2450.04 6931.86,2382.37 6832.86,2283.37 6832.86,2251.04 ; v1@8197.36,4883.37 ccw(c8174.42,4883.37) 8190.64,4899.59 ccw(c8206.86,4915.81) v1@8206.86,4892.87 ; v1@8201.36,4883.37 ccw(c8188.08,4883.37) 8197.47,4892.76 ccw(c8206.86,4902.15) v1@8206.86,4888.87
DB_PROGRAM.ID0: NT4.1 U30.E20 | length 340.4
  Top Layer w8: U30.E20@7226.54,1485.14 cw(c7226.54,1471.04) 7236.51,1481.01 cw(c7246.48,1490.98) U30.E20@7232.38,1490.98 ; U30.E20@7226.54,1490.98 v2(7246.22,1471.3) ; v2@7237.22,1471.3 ccw(c7215.49,1471.3) 7230.86,1486.66 ccw(c7246.22,1502.03) v2@7246.22,1480.3
  MidLayer1 w4: v2@7238.44,1463.52 cw(c7219.66,1444.74) 7246.22,1444.74 cw(c7272.78,1444.74) v2@7254,1463.52 ; v2@7241.27,1466.35 cw(c7229.32,1454.4) 7246.22,1454.4 ; v1@7243.98,1401.38 ccw(c7239.8,1409.04) 7248.52,1409.04 ; 7246.22,1454.4 cw(c7263.12,1454.4) v2@7251.17,1466.35 ; v2(7246.22,1471.3) 7246.22,1411.34 7248.52,1409.04 ; v1(7248.52,1393.04) 7248.52,1409.04 ; v1@7253.07,1401.38 cw(c7257.25,1409.04) 7248.52,1409.04
  Bottom Layer w4: v1@7244.88,1384.27 cw(c7238.59,1369.11) NT4.1@7255,1369.11 ; v1@7246.41,1387.96 cw(c7241.07,1375.1) NT4.1@7255,1375.1 ; v1@7247.95,1391.66 cw(c7243.56,1381.09) 7255,1381.09 ; v1(7248.52,1393.04) 7255,1386.56 NT4.1@7255,1370 ; NT4.1@7252.17,1377.33 ccw(c7245.34,1384.16) 7255,1384.16 ccw(c7264.66,1384.16) NT4.1@7257.83,1377.33
DB_PROGRAM.ID1: NT5.1 U30.R4 | length 467.6
  Top Layer w8: v2@6813.15,2131.59 cw(c6813.15,2109.86) 6828.51,2125.23 cw(c6843.88,2140.59) v2@6822.15,2140.59 ; v2(6813.15,2140.59) U30.R4@6832.83,2120.91 ; U30.R4@6826.99,2120.91 ccw(c6812.89,2120.91) 6822.86,2130.88 ccw(c6832.83,2140.85) U30.R4@6832.83,2126.75
  MidLayer1 w4: v1@6773.52,2303.87 cw(c6773.52,2280.94) 6789.74,2297.16 cw(c6805.96,2313.37) v1@6783.02,2313.37 ; v1@6773.52,2307.87 cw(c6773.52,2294.6) 6782.91,2303.99 cw(c6792.3,2313.37) v1@6779.02,2313.37 ; v1(6773.52,2313.37) 6792.86,2294.04 6792.86,2160.88 v2(6813.15,2140.59) ; v2@6802.15,2140.59 ccw(c6775.59,2140.59) 6794.37,2159.37 ccw(c6813.15,2178.14) v2@6813.15,2151.59 ; v2@6806.15,2140.59 ccw(c6789.25,2140.59) 6801.2,2152.54 ccw(c6813.15,2164.49) v2@6813.15,2147.59
  Bottom Layer w4: v1@6766.81,2320.09 ccw(c6759.1,2327.8) NT5.1@6770,2327.8 ; NT5.1@6767.92,2327.08 cw(c6765.65,2323.38) v1@6770,2323.38 ; NT5.1@6770,2328.36 ccw(c6781.45,2328.36) v1@6776.1,2318.24 ; NT5.1@6770,2335 ccw(c6784.96,2335) v1@6777.97,2321.77 ; NT5.1@6770,2335 v1@6770,2323.37 ; NT5.1@6772.08,2327.09 ccw(c6774.35,2323.38) v1@6770,2323.38 ; v1(6773.52,2313.37) 6773.52,2319.85 v1@6770,2323.37
DB_PROGRAM.ID2: NT6.1 U30.F20 | length 291.1
  Top Layer w8: U30.F20@7187.17,1485.14 cw(c7187.17,1471.04) 7197.14,1481.01 cw(c7207.11,1490.98) U30.F20@7193.01,1490.98 ; U30.F20@7187.17,1490.98 v2(7206.85,1471.3) ; v2@7197.85,1471.3 ccw(c7176.12,1471.3) 7191.49,1486.66 ccw(c7206.85,1502.03) v2@7206.85,1480.3
  MidLayer1 w4: v2@7199.07,1463.52 cw(c7180.29,1444.74) 7206.85,1444.74 cw(c7233.41,1444.74) v2@7214.63,1463.52 ; v2@7201.9,1466.35 cw(c7189.95,1454.4) 7206.85,1454.4 ; 7206.85,1454.4 cw(c7223.75,1454.4) v2@7211.8,1466.35 ; v2(7206.85,1471.3) 7206.85,1417.38 7215.19,1409.04 ; v1@7210.64,1401.38 ccw(c7206.47,1409.04) 7215.19,1409.04 ; v1(7215.19,1393.04) 7215.19,1409.04 ; v1@7219.74,1401.38 cw(c7223.91,1409.04) 7215.19,1409.04
  Bottom Layer w4: NT6.1@7212.17,1377.33 ccw(c7204.88,1384.62) v1@7215.19,1384.62 ; NT6.1@7215,1370 7215,1377.04 7215.19,1377.23 v1(7215.19,1393.04) ; v1@7215.19,1383.7 ccw(c7224.2,1383.7) NT6.1@7217.83,1377.33
DB_PROGRAM.ID3: NT7.1 U30.R1 | length 258.8
  Top Layer w8: v2@6813.15,2249.7 cw(c6813.15,2227.97) 6828.51,2243.34 cw(c6843.88,2258.7) v2@6822.15,2258.7 ; v2(6813.15,2258.7) U30.R1@6832.83,2239.02 ; U30.R1@6826.99,2239.02 ccw(c6812.89,2239.02) 6822.86,2248.99 ccw(c6832.83,2258.96) U30.R1@6832.83,2244.86
  Bottom Layer w4: NT7.1@6800,2326.5 cw(c6800,2305.98) 6814.51,2320.49 ; NT7.1@6800,2330.5 cw(c6800,2319.64) 6807.68,2327.32 ; NT7.1@6800,2335 6813.15,2321.85 v2(6813.15,2258.7) ; v2@6805.37,2266.48 ccw(c6786.59,2285.26) 6813.15,2285.26 ccw(c6839.7,2285.26) v2@6820.93,2266.48 ; v2@6808.2,2263.65 ccw(c6796.25,2275.6) 6813.15,2275.6 ; 6813.15,2275.6 ccw(c6830.05,2275.6) v2@6818.1,2263.65
DB_PROGRAM.INIT: R76.1 U8.AA15 U30.U3 | length 10757.2
  Top Layer w4: U8.AA15@5449.06,3887.22 cw(c5449.06,3869.12) 5461.86,3881.92 cw(c5474.66,3894.72) U8.AA15@5456.56,3894.72 ; U8.AA15@5449.06,3887.38 cw(c5449.06,3869.66) 5461.59,3882.19 cw(c5474.12,3894.72) U8.AA15@5456.4,3894.72 ; U8.AA15@5449.06,3894.72 v3(5468.74,3875.04) ; 5455.94,3887.84 cw(c5443.13,3875.04) 5461.24,3875.04 ccw(c5443.13,3875.04) 5455.94,3887.84 ; 5455.94,3887.84 ccw(c5468.74,3900.65) 5468.74,3882.54 cw(c5468.74,3900.65) 5455.94,3887.84
  Top Layer w8: v2@6734.41,2170.96 cw(c6734.41,2149.23) 6749.77,2164.6 cw(c6765.14,2179.96) v2@6743.41,2179.96 ; v2(6734.41,2179.96) U30.U3@6754.09,2160.28 ; U30.U3@6748.25,2160.28 ccw(c6734.15,2160.28) 6744.12,2170.25 ccw(c6754.09,2180.22) U30.U3@6754.09,2166.12
  MidLayer1 w4: v3@5468.09,3867.57 cw(c5466.51,3849.53) 5480.38,3861.17 ; v3@5476.21,3874.39 ccw(c5494.25,3872.81) 5480.38,3861.17 ; 5492.6,3798.23 5492.6,3812.16 ; v1(5498.52,3008.37) 5498.52,3136.36 5506.86,3144.69 5506.86,3211.35 5481.86,3236.35 5481.86,3360.69 5523.52,3402.36 5523.52,3501.29 5497.31,3527.5 5492.75,3527.5 5482.5,3537.75 5482.5,3595.12 5481.5,3596.12 5481.5,3624.98 5492.6,3636.08 5492.6,3660 5492.6,3670 5492.6,3718.62 5492.6,3738.04 5492.6,3812.16 ; v1@5525.14,5119.09 ccw(c5508.92,5135.31) 5531.86,5135.31 ccw(c5554.79,5135.31) v1@5538.57,5119.09 ; v1@5527.97,5116.26 ccw(c5518.58,5125.65) 5531.86,5125.65 ccw(c5545.14,5125.65) v1@5535.75,5116.26 ; v1(5531.86,5112.37) 5531.86,5285.75 5690.19,5444.08 5690.19,5530.19 5810.04,5650.04 6442.56,5650.04 6818.6,5274 7324.56,5274 v1(7555.52,5043.04) ; v2@6723.41,2179.96 ccw(c6696.85,2179.96) 6715.63,2198.74 ccw(c6734.41,2217.51) v2@6734.41,2190.96 ; v2@6727.41,2179.96 ccw(c6710.51,2179.96) 6722.46,2191.91 ccw(c6734.41,2203.86) v2@6734.41,2186.96 ; v2(6734.41,2179.96) 6715.19,2199.18 6715.19,2308.37 6781.86,2375.04 6781.86,2516.71 6798.94,2533.79 6890,2533.79 6956.86,2600.65 6956.86,2765.71 v1(7016.19,2825.04) ; v1@7006.69,2825.04 cw(c6983.76,2825.04) 6999.97,2808.82 cw(c7016.19,2792.61) v1@7016.19,2815.54 ; v1@7010.69,2825.04 cw(c6997.41,2825.04) 7006.8,2815.65 cw(c7016.19,2806.26) v1@7016.19,2819.54 ; v1(7073.52,2791.71) 7159.23,2791.71 7265.19,2897.67 7265.19,3058.37 7298.52,3091.71 7298.52,4146.71 7336.78,4184.97 7348.86,4197.04 7348.86,4330.17 7399.86,4381.17 7399.86,4465.14 7372.52,4492.48 7372.52,4524.04 7373.52,4525.04 7373.52,4633.37 7372.52,4634.37 7372.52,4717.52 7463.21,4808.21 7489.83,4808.21 7515,4833.37 v1(7549.52,4833.37) ; v1@7077.41,2787.82 cw(c7086.8,2778.43) 7086.8,2791.71 cw(c7086.8,2804.99) v1@7077.41,2795.6 ; v1@7080.24,2784.99 cw(c7096.46,2768.77) 7096.46,2791.71 cw(c7096.46,2814.64) v1@7080.24,2798.43 ; v1@7542.81,4826.66 ccw(c7526.59,4810.44) 7526.59,4833.37 ccw(c7526.59,4856.31) v1@7542.81,4840.09 ; v1@7545.64,4829.49 ccw(c7536.25,4820.1) 7536.25,4833.37 ccw(c7536.25,4846.65) v1@7545.64,4837.26 ; v1@7546.02,5043.04 ccw(c7523.09,5043.04) 7539.31,5059.26 ccw(c7555.52,5075.48) v1@7555.52,5052.54 ; v1@7550.02,5043.04 ccw(c7536.75,5043.04) 7546.14,5052.43 ccw(c7555.52,5061.82) v1@7555.52,5048.54 ; 5480.38,3861.17 cw(c5450.87,3831.66) 5492.6,3831.66 5492.6,3812.16
  MidLayer2 w4: v1(5498.52,3008.37) 5571.67,3008.37 5580,3016.71 5630.86,3016.71 5639.19,3008.37 5639.19,2860.04 5641.86,2857.37 5731.86,2857.37 5748.52,2874.04 5748.52,2958.37 5765.19,2975.04 5790.19,2975.04 5806.86,2958.37 5806.86,2925.04 5798.52,2916.71 5798.52,2885.37 5850.52,2833.37 6313.19,2833.37 6338.19,2858.37 6573.52,2858.37 6631.86,2800.04 6631.86,2314.04 6583.52,2265.71 6515.19,2265.71 6506.86,2257.37 6506.86,2188.14 6534.29,2160.71 6715.16,2160.71 v2(6734.41,2179.96) ; v1@5502.41,3004.49 cw(c5511.8,2995.1) 5511.8,3008.37 cw(c5511.8,3021.65) v1@5502.41,3012.26 ; v1@5505.24,3001.66 cw(c5521.46,2985.44) 5521.46,3008.37 cw(c5521.46,3031.31) v1@5505.24,3015.09 ; v2@6723.41,2179.96 cw(c6696.85,2179.96) 6715.63,2161.18 cw(c6734.41,2142.41) v2@6734.41,2168.96 ; v2@6727.41,2179.96 cw(c6710.51,2179.96) 6722.46,2168.01 cw(c6734.41,2156.06) v2@6734.41,2172.96
  Bottom Layer w4: R76.1@5418.68,5085 5449.56,5085 5467.86,5066.71 5523.52,5066.71 5531.86,5075.04 v1(5531.86,5112.37) ; R76.1@5422.44,5081.24 cw(c5431.52,5072.16) 5431.52,5085 cw(c5431.52,5097.84) R76.1@5422.44,5088.76 ; R76.1@5425.27,5078.41 cw(c5441.18,5062.5) 5441.18,5085 cw(c5441.18,5107.5) R76.1@5425.27,5091.59 ; v1@5525.14,5105.66 cw(c5508.92,5089.44) 5531.86,5089.44 cw(c5554.79,5089.44) v1@5538.57,5105.66 ; v1@5527.97,5108.49 cw(c5518.58,5099.1) 5531.86,5099.1 cw(c5545.14,5099.1) v1@5535.75,5108.49 ; v1@7016.19,2815.54 cw(c7016.19,2792.61) 7032.41,2808.82 cw(c7048.63,2825.04) v1@7025.69,2825.04 ; v1@7016.19,2819.54 cw(c7016.19,2806.26) 7025.58,2815.65 cw(c7034.97,2825.04) v1@7021.69,2825.04 ; v1(7016.19,2825.04) 7049.52,2791.71 v1(7073.52,2791.71) ; v1@7066.81,2784.99 ccw(c7050.59,2768.77) 7050.59,2791.71 ccw(c7050.59,2814.64) v1@7066.81,2798.43 ; v1@7069.64,2787.82 ccw(c7060.25,2778.43) 7060.25,2791.71 ccw(c7060.25,2804.99) v1@7069.64,2795.6 ; v1@7542.81,4840.09 ccw(c7526.59,4856.31) 7549.52,4856.31 ccw(c7572.46,4856.31) v1@7556.24,4840.09 ; v1@7545.64,4837.26 ccw(c7536.25,4846.65) 7549.52,4846.65 ccw(c7562.8,4846.65) v1@7553.41,4837.26 ; v1@7548.81,5036.32 cw(c7532.59,5020.11) 7555.52,5020.11 cw(c7578.46,5020.11) v1@7562.24,5036.32 ; v1(7549.52,4833.37) 7549.52,4999 7555.52,5005 v1(7555.52,5043.04) ; v1@7551.64,5039.15 cw(c7542.25,5029.76) 7555.52,5029.76 cw(c7568.8,5029.76) v1@7559.41,5039.15
DB_PROGRAM.M0: R81.1 U30.R5 | length 2535.3
  Top Layer w8: v2@6813.15,2092.22 cw(c6813.15,2070.49) 6828.51,2085.86 cw(c6843.88,2101.22) v2@6822.15,2101.22 ; v2(6813.15,2101.22) U30.R5@6832.83,2081.54 ; U30.R5@6826.99,2081.54 ccw(c6812.89,2081.54) 6822.86,2091.51 ccw(c6832.83,2101.48) U30.R5@6832.83,2087.38
  MidLayer1 w4: v1@5933.47,2868.32 cw(c5917.26,2852.11) 5940.19,2852.11 cw(c5963.13,2852.11) v1@5946.91,2868.32 ; v1@5936.3,2871.15 cw(c5926.91,2861.76) 5940.19,2861.76 cw(c5953.47,2861.76) v1@5944.08,2871.15 ; v1(5940.19,2875.04) 5940.19,2848.06 5915.19,2823.06 5915.19,2807.06 5921.69,2800.56 5921.69,2766.18 5915.19,2759.68 5915.19,2648.28 5989.52,2573.94 5989.52,2498.34 6062.82,2425.04 v1(6091.86,2425.04) ; v1@6085.14,2418.32 ccw(c6068.92,2402.11) 6068.92,2425.04 ccw(c6068.92,2447.98) v1@6085.14,2431.76 ; v1@6087.97,2421.15 ccw(c6078.58,2411.76) 6078.58,2425.04 ccw(c6078.58,2438.32) v1@6087.97,2428.93 ; v1(6245.19,2441.71) 6256.86,2430.04 6256.86,2175.31 6298.52,2133.65 6298.52,2017.37 6407.52,1908.37 6556.86,1908.37 v1(6573.52,1891.71) ; v1@6564.02,1891.71 ccw(c6541.09,1891.71) 6557.31,1907.93 ccw(c6573.52,1924.14) v1@6573.52,1901.21 ; v1@6568.02,1891.71 ccw(c6554.75,1891.71) 6564.14,1901.1 ccw(c6573.52,1910.49) v1@6573.52,1897.21
  MidLayer2 w4: v1(6091.86,2425.04) 6108.52,2441.71 v1(6245.19,2441.71) ; v1@6091.86,2430.54 ccw(c6091.86,2443.82) 6101.25,2434.43 ccw(c6110.64,2425.04) v1@6097.36,2425.04 ; v1@6091.86,2434.54 ccw(c6091.86,2457.48) 6108.07,2441.26 ccw(c6124.29,2425.04) v1@6101.36,2425.04 ; v1@6238.47,2434.99 ccw(c6222.26,2418.77) 6222.26,2441.71 ccw(c6222.26,2464.64) v1@6238.47,2448.43 ; v1@6241.3,2437.82 ccw(c6231.91,2428.43) 6231.91,2441.71 ccw(c6231.91,2454.99) v1@6241.3,2445.6
  Bottom Layer w4: R81.1@5921.59,2842.08 ccw(c5905.68,2857.99) 5928.18,2857.99 ccw(c5950.68,2857.99) R81.1@5934.77,2842.08 ; R81.1@5924.42,2839.25 ccw(c5915.34,2848.33) 5928.18,2848.33 ccw(c5941.02,2848.33) R81.1@5931.94,2839.25 ; R81.1@5928.18,2835 5928.18,2863.03 v1(5940.19,2875.04) ; v1@6573.52,1882.21 cw(c6573.52,1859.27) 6589.74,1875.49 cw(c6605.96,1891.71) v1@6583.02,1891.71 ; v1@6573.52,1886.21 cw(c6573.52,1872.93) 6582.91,1882.32 cw(c6592.3,1891.71) v1@6579.02,1891.71 ; v1(6573.52,1891.71) 6590.19,1875.04 6776.86,1875.04 6793.52,1891.71 6793.52,2081.59 v2(6813.15,2101.22) ; v2@6802.15,2101.22 cw(c6775.59,2101.22) 6794.37,2082.44 cw(c6813.15,2063.67) v2@6813.15,2090.22 ; v2@6806.15,2101.22 cw(c6789.25,2101.22) 6801.2,2089.27 cw(c6813.15,2077.32) v2@6813.15,2094.22
DB_PROGRAM.M1: R80.1 U30.V2 | length 1904.8
  Top Layer w8: v2@6695.04,2210.33 cw(c6695.04,2188.6) 6710.4,2203.97 cw(c6725.77,2219.33) v2@6704.04,2219.33 ; v2(6695.04,2219.33) U30.V2@6714.72,2199.65 ; U30.V2@6708.88,2199.65 ccw(c6694.78,2199.65) 6704.75,2209.62 ccw(c6714.72,2219.59) U30.V2@6714.72,2205.49
  MidLayer2 w4: v1@5990.19,2944.21 cw(c5990.19,2921.27) 6006.41,2937.49 cw(c6022.63,2953.71) v1@5999.69,2953.71 ; v1@5990.19,2948.21 cw(c5990.19,2934.93) 5999.58,2944.32 cw(c6008.97,2953.71) v1@5995.69,2953.71 ; v1(5990.19,2953.71) 6014.86,2929.04 6122.33,2929.04 6160,2966.71 6432.31,2966.71 6490.65,2908.37 6540.19,2908.37 6640.19,2808.37 6640.19,2311.04 6586.86,2257.71 6563.19,2257.71 6556.86,2251.37 6556.86,2227.04 6583.86,2200.04 6675.86,2200.04 6685.19,2209.37 6685.19,2209.48 v2(6695.04,2219.33) ; 6676.19,2200.37 ccw(c6657.23,2219.33) v2@6684.04,2219.33 ; 6676.44,2200.63 cw(c6695.04,2182.03) v2@6695.04,2208.33 ; 6683.02,2207.2 ccw(c6670.89,2219.33) v2@6688.04,2219.33 ; 6683.27,2207.45 cw(c6695.04,2195.69) v2@6695.04,2212.33
  Bottom Layer w4: R80.1@5928.18,2955 5929.47,2953.71 v1(5990.19,2953.71) ; R80.1@5931.94,2958.27 ccw(c5942.95,2969.28) 5942.95,2953.71 ; R80.1@5934.77,2947.92 cw(c5948.75,2933.94) 5948.75,2953.71 ; R80.1@5934.77,2961.1 ccw(c5952.61,2978.94) 5952.61,2953.71 ; v1@5983.47,2946.99 ccw(c5967.26,2930.77) 5967.26,2953.71 ccw(c5967.26,2976.64) v1@5983.47,2960.43 ; v1@5986.3,2949.82 ccw(c5976.91,2940.43) 5976.91,2953.71 ccw(c5976.91,2966.99) v1@5986.3,2957.6
DB_PROGRAM.M2: R79.1 U30.U5 | length 2582.6
  Top Layer w8: v2@6734.41,2092.22 cw(c6734.41,2070.49) 6749.77,2085.86 cw(c6765.14,2101.22) v2@6743.41,2101.22 ; v2(6734.41,2101.22) U30.U5@6754.09,2081.54 ; U30.U5@6748.25,2081.54 ccw(c6734.15,2081.54) 6744.12,2091.51 ccw(c6754.09,2101.48) U30.U5@6754.09,2087.38
  MidLayer1 w4: v1@5933.47,3159.99 cw(c5917.26,3143.77) 5940.19,3143.77 cw(c5963.13,3143.77) v1@5946.91,3159.99 ; v1@5936.3,3162.82 cw(c5926.91,3153.43) 5940.19,3153.43 cw(c5953.47,3153.43) v1@5944.08,3162.82 ; v1(5940.19,3166.71) 5940.19,3031 5950.19,3021 5950.19,2916.04 5957.86,2908.37 5957.86,2671.06 6065.19,2563.73 v1(6065.19,2483.37) ; v1@6058.47,2490.09 ccw(c6042.26,2506.31) 6065.19,2506.31 ccw(c6088.13,2506.31) v1@6071.91,2490.09 ; v1@6061.3,2487.26 ccw(c6051.91,2496.65) 6065.19,2496.65 ccw(c6078.47,2496.65) v1@6069.08,2487.26
  Bottom Layer w4: R79.1@5921.59,3082.08 ccw(c5916.93,3086.75) R79.1@5923.52,3086.75 ; 5923.52,3089.92 ccw(c5942.61,3089.92) R79.1@5929.11,3076.42 ; 5923.52,3099.58 ccw(c5952.26,3099.58) R79.1@5931.94,3079.25 ; 5923.52,3109.23 ccw(c5961.92,3109.23) R79.1@5934.77,3082.08 ; R79.1@5928.18,3075.04 5923.52,3075.04 5923.52,3150.04 v1(5940.19,3166.71) ; v1@5930.69,3166.71 cw(c5907.76,3166.71) 5923.97,3150.49 cw(c5940.19,3134.27) v1@5940.19,3157.21 ; v1@5934.69,3166.71 cw(c5921.41,3166.71) 5930.8,3157.32 cw(c5940.19,3147.93) v1@5940.19,3161.21 ; v1@6057.02,2478.53 ccw(c6048.52,2473.51) 6048.52,2483.37 ccw(c6048.52,2493.24) v1@6057.02,2488.21 ; v1(6065.19,2483.37) 5973.37,2483.37 5940.19,2450.19 5940.19,2133.69 6021.34,2052.54 6043.69,2030.19 6290,2030.19 6292.19,2032.37 6420.52,2160.71 6706.86,2160.71 6715.19,2152.37 6715.19,2125.04 6723.52,2116.71 6723.52,2101.21 v2(6734.41,2101.22)